# Altium PCB fab_scope_pcb.pcbdoc
Units mil, origin at the board's own origin, x right, y up, seen from the top; angles counter-clockwise.
Board outline 2510 x 3706.06 mil, 2 copper layers (Top Layer, Bottom Layer), stack 62.206 mil thick; 28 components, 35 nets, 134 pads, 0 vias.
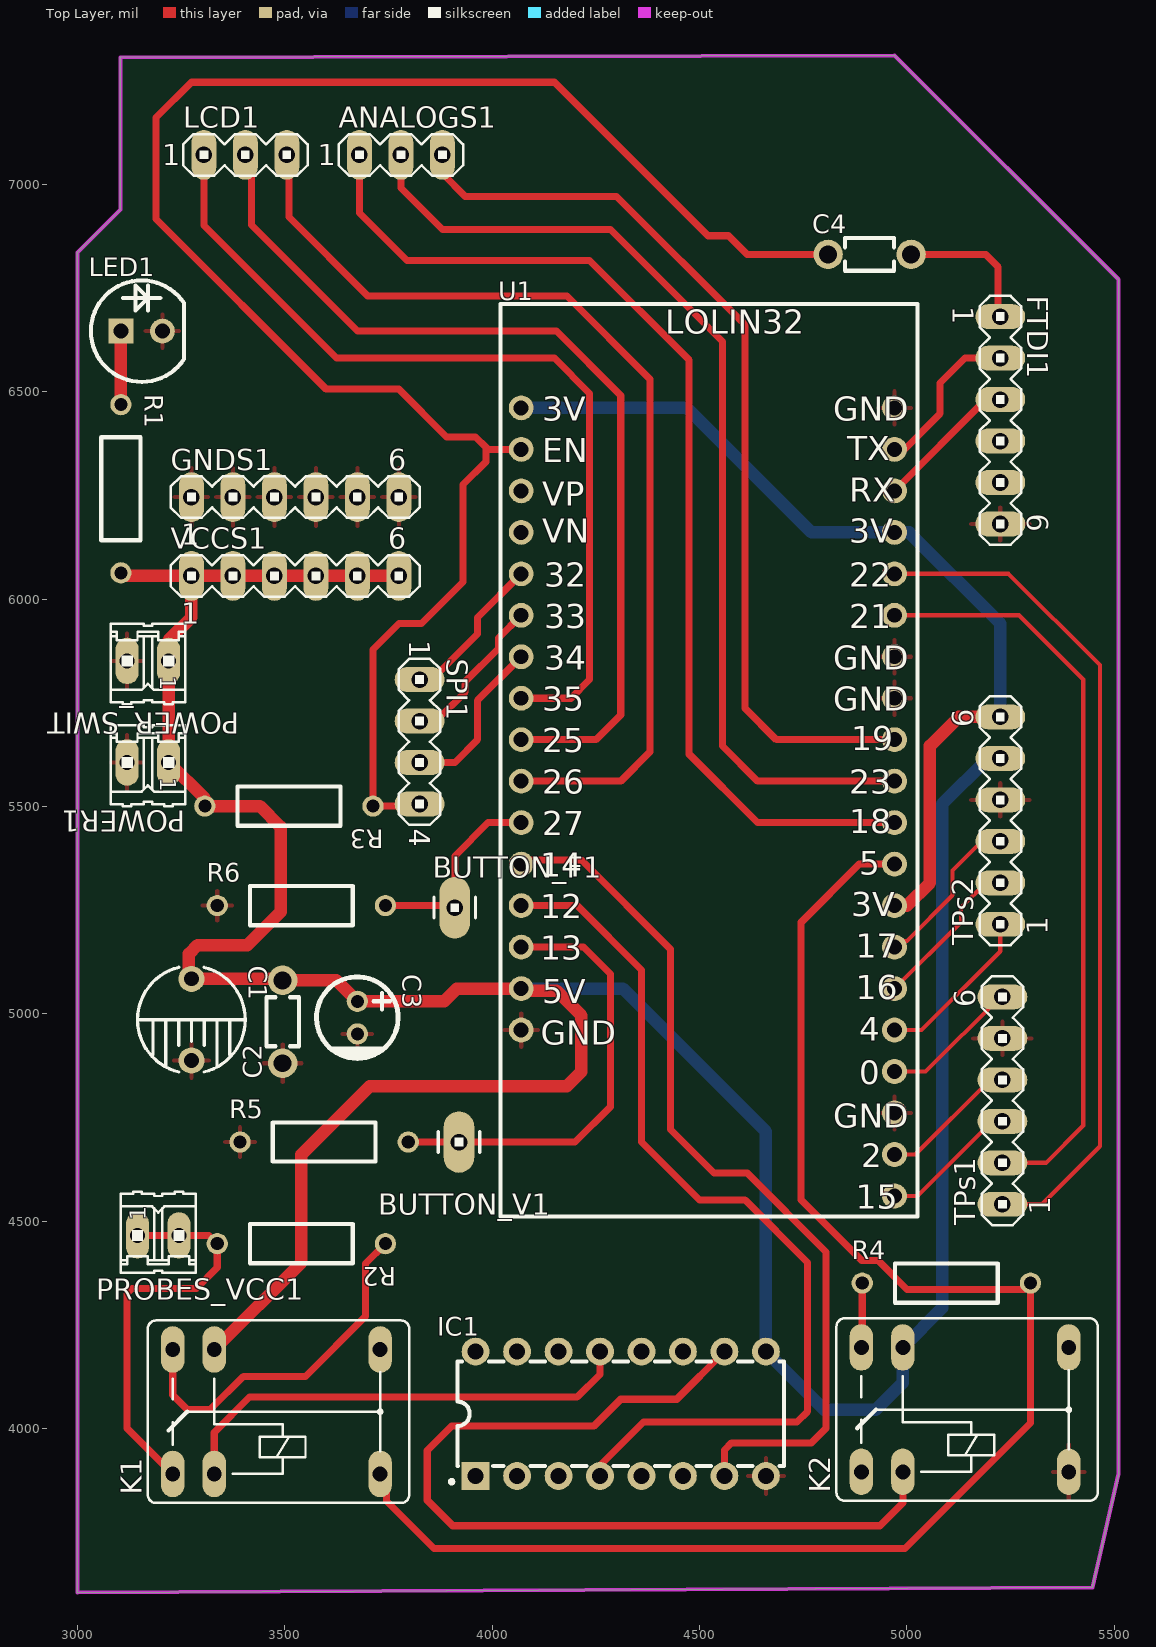
[diagram p0: Top Layer view]
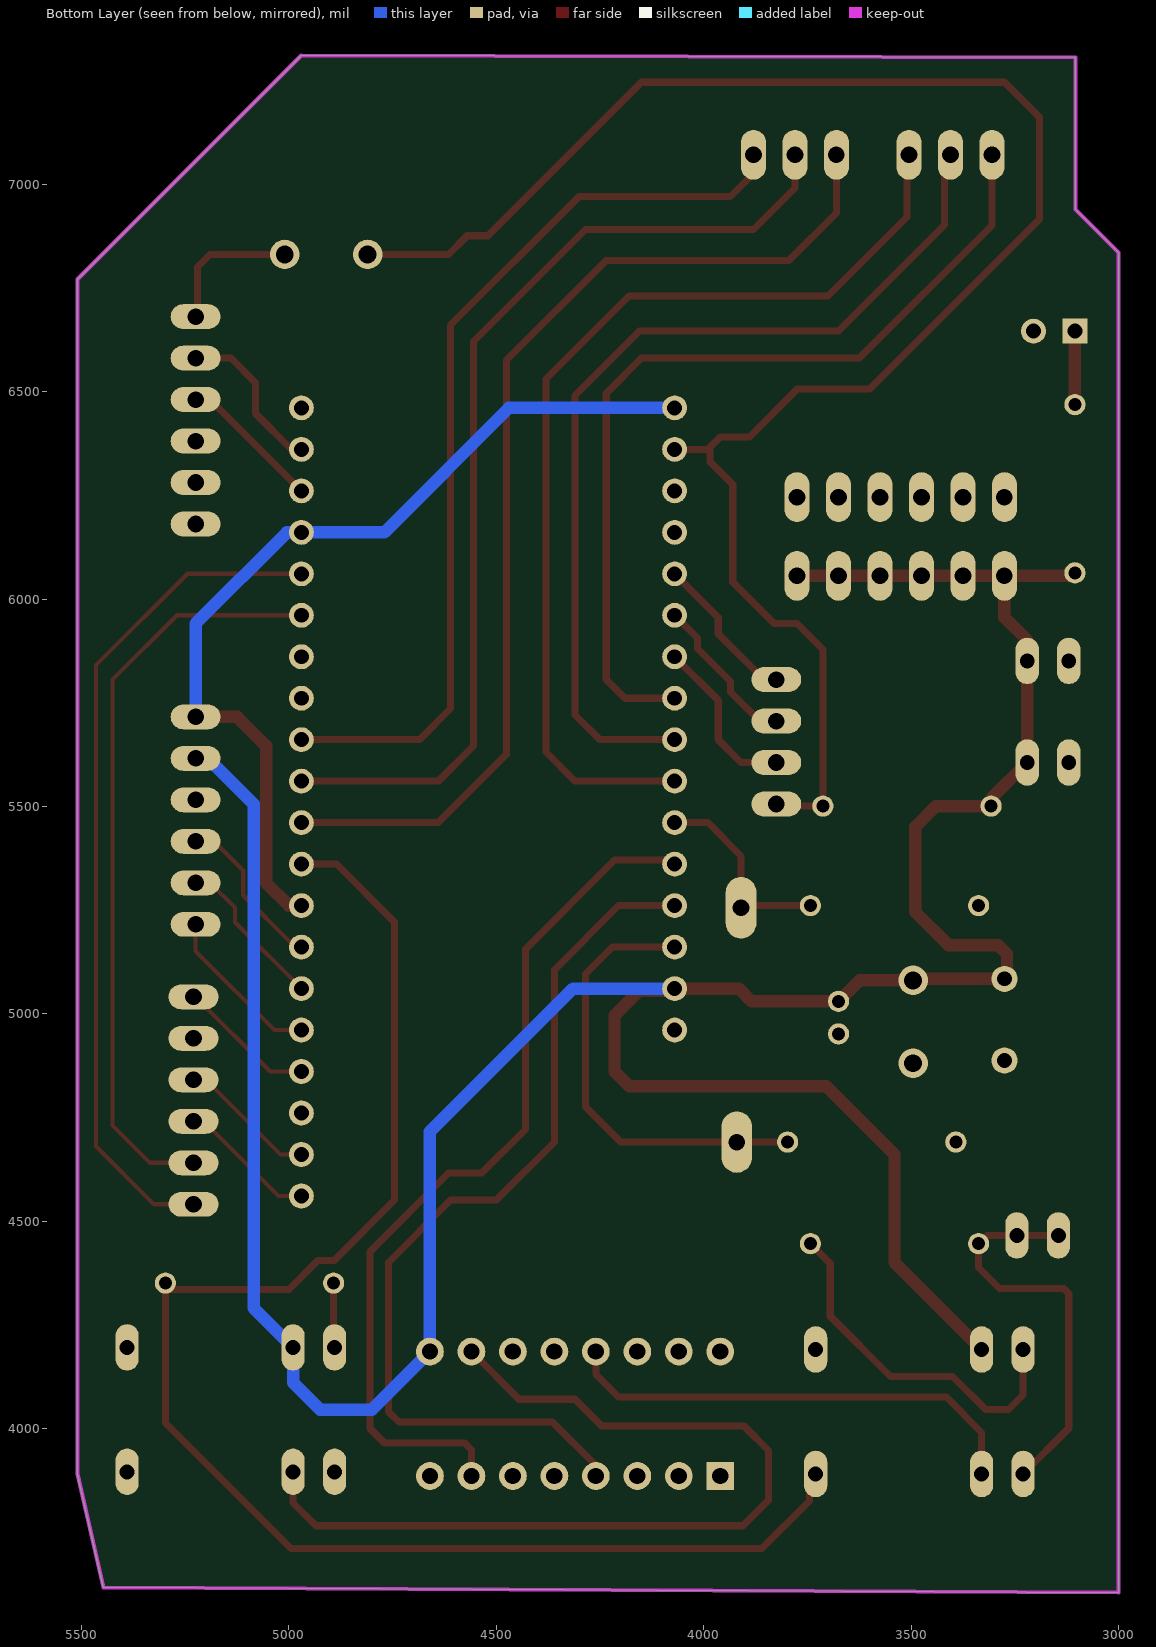
[diagram p1: Bottom Layer view, seen from below]

## Layer stack, top to bottom
Top Solder Mask Layer: solder mask 0.394, Dk 3.3
Top Layer: signal copper 1.379
Dielectric1: surface 59.449, FR4, Dk 4.5
Bottom Layer: signal copper 1.378
Bottom Solder Mask Layer: solder mask 0.394, Dk 3.3

## Board outline
3000,3604.72 3000,6835.42 3103.9,6939.32 3103.9,7305.95 4970.17,7310.78 5510,6770.95 5510,3891.09 5447.15,3617.21

## Design rules (kind name [scope] priority, off if disabled: settings)
BoardOutlineClearance copperThickness1oz [All] p0: genericclearance=10 ignorepadtopadclearanceinfootprint=FALSE except(0: Arc-SplitContinuation Track-SplitContinuation SMDPad-SplitContinuation THPad-SplitContinuation Via-SplitContinuation Fill-SplitContinuation Poly-SplitContinuation Region-SplitContinuation Text-SplitContinuation)
BoardOutlineClearance copperThickness2oz [All] p0: genericclearance=10 ignorepadtopadclearanceinfootprint=FALSE except(0: Arc-SplitContinuation Track-SplitContinuation SMDPad-SplitContinuation THPad-SplitContinuation Via-SplitContinuation Fill-SplitContinuation Poly-SplitContinuation Region-SplitContinuation Text-SplitContinuation)
BoardOutlineClearance otherClearance [All] p0: genericclearance=10 ignorepadtopadclearanceinfootprint=FALSE except(0: Arc-SplitContinuation Track-SplitContinuation SMDPad-SplitContinuation THPad-SplitContinuation Via-SplitContinuation Fill-SplitContinuation Poly-SplitContinuation Region-SplitContinuation Text-SplitContinuation)
Clearance copperThickness1oz [All] p1: gap=7 ignorepadtopadclearanceinfootprint=FALSE
Clearance copperThickness2oz [All] p1: gap=7 ignorepadtopadclearanceinfootprint=FALSE
Clearance otherClearance [All] p1: gap=7 ignorepadtopadclearanceinfootprint=FALSE
DiffPairsRouting differentialPair [All] p1: maxuncoupledlength=10 minlimit=6 maxlimit=Infinity mostfreqgap=6 toplayer_minwidth=5 toplayer_prefwidth=10 toplayer_maxwidth=100 bottomlayer_minwidth=5 bottomlayer_prefwidth=10 bottomlayer_maxwidth=100
PasteMaskExpansion pasteMaskExpansion [All] p1: expansion=0
PlaneConnect innerPlane [All] p1: planeconnectstyle=Relief reliefexpansion=20 reliefentries=4 reliefconductorwidth=10 reliefairgap=10
PolygonConnect copperRegion [All] p1: connectstyle=Relief reliefentries=4 reliefconductorwidth=10 polygonreliefangle="90 Angle" airgapwidth=10
RoutingVias viaSize [All] p1: viastyle="Through Hole" holewidth=12.0078 minholewidth=11.811 maxholewidth=248.0314 width=12.0078 minwidth=11.811 maxwidth=248.0314
SolderMaskExpansion solderMaskExpansion [IsVia] p1: useseparateexpansions=TRUE expansion=-1000 expansionbottom=-1000
SolderMaskExpansion solderMaskExpansion [All] p2: useseparateexpansions=TRUE expansion=2 expansionbottom=2
Width copperThickness1oz [All] p1: maxlimit=100 minlimit=5 preferedwidth=10
Width copperThickness2oz [All] p1: maxlimit=100 minlimit=8 preferedwidth=10

## Components (designator, comment, footprint, x,y, rotation, side; value= is the part's Value field where it differs from the comment)
ANALOGS1 "MA03-1" MA03-1 3780,7070.95 r0 top
BUTTON_F1 "M01PTH_LONGPAD" 1X01_LONGPAD 3910,5255.95 r0 top
BUTTON_V1 "M01PTH_LONGPAD" 1X01_LONGPAD 3920,4690.95 r0 top
C1 "1uF" CAP-TH_BD6.3-P5.00-D0.5-FD 3275,4985.95 r270 top
C2 "100nF" CAP-TH_L3.0-W2.0-P5.08-D0.7 3495,4980.95 r90 top
C3 "10uF" CAP-TH_BD5.0-P2.00-D0.8-FD 3675,4990.95 r270 top
C4 "100nF" CAP-TH_L3.0-W2.0-P5.08-D0.7 4910,6830.95 r0 top
FTDI1 "MA06-1" MA06-1 5225,6430.95 r270 top
GNDS1 "MA06-1" MA06-1 3525,6245.95 r0 top
IC1 "ULN2003AN" DIP-16_L19.7-W6.6-P2.54-LS7.6-BL 4310,4035.95 r0 top
K1 "FRS1B" FRS1B 3330,4040.95 r0 top
K2 "FRS1B" FRS1B 4990,4045.95 r0 top
LCD1 "MA03-1" MA03-1 3405,7070.95 r0 top
LED1 "GREEN LED" LED-TH_BD5.9-P2.54-FD-1 3155,6645.95 r0 top
POWER1 "M02" 02P 3170,5605.95 r180 top
POWER_SWITCH1 "M02" 02P 3170,5850.95 r180 top
PROBES_VCC1 "M02" 02P 3195,4465.95 r0 top
R1 "10k" RES-TH_BD2.4-L6.3-P10.30-D0.6 3105,6265.95 r270 top
R2 "100k" RES-TH_BD2.4-L6.3-P10.30-D0.6 3540,4445.95 r180 top
R3 "10k" RES-TH_BD2.4-L6.3-P10.30-D0.6 3510,5500.95 r180 top
R4 "10k" RES-TH_BD2.4-L6.3-P10.30-D0.6 5095,4350.95 r0 top
R5 "10k" RES-TH_BD2.4-L6.3-P10.30-D0.6 3595,4690.95 r0 top
R6 "10k" RES-TH_BD2.4-L6.3-P10.30-D0.6 3540,5260.95 r0 top
SPI1 "MA04-1" MA04-1 3825,5655.95 r270 top
TPs1 "MA06-1" MA06-1 5230,4790.95 r90 top
TPs2 "MA06-1" MA06-1 5225,5465.95 r90 top
U1 "LOLIN32" LOLIN32 4070,6460.95 r0 top
VCCS1 "MA06-1" MA06-1 3525,6055.95 r0 top

## Footprints (in the part's own frame and the unit in brackets; to place one, negate y for a bottom-side part, rotate by r counter-clockwise, add the part's x,y. Pads: shape width x height; smd on the part's side, far side on the other; paste and mask are expansions set on the pad)
1X01_LONGPAD [mil]
  oval 74x148 hole 40 paste+0 mask+4: 1(0,0)
  silkscreen extent -50,-25 50,25
02P [mil]
  oval 56x112 hole 36 paste+0 mask+4: 1(-50,0) 2(50,0)
  silkscreen extent -90,-90 90,105
CAP-TH_BD5.0-P2.00-D0.8-FD [mm]
  round 1.3 hole 0.8: 1(-1,0) 2(1,0)
  silkscreen extent -2.5,-2.5 2.5,2.5
CAP-TH_BD6.3-P5.00-D0.5-FD [mm]
  round 1.6 hole 0.9 paste+0 mask+0.05: 1(-2.5,0) 2(2.5,0)
  silkscreen extent -3.21,-3.3 3.21,3.3
CAP-TH_L3.0-W2.0-P5.08-D0.7 [mm]
  round 1.8 hole 1.1: 1(-2.54,0) 2(2.54,0)
  silkscreen extent -1.5,-1 1.5,1
DIP-16_L19.7-W6.6-P2.54-LS7.6-BL [mm]
  rect 1.7x1.7 hole 1: 1(-8.89,-3.81)
  round 1.7 hole 1: 2(-6.35,-3.81) 3(-3.81,-3.81) 4(-1.27,-3.81) 5(1.27,-3.81) 6(3.81,-3.81) 7(6.35,-3.81) 8(8.89,-3.81) 9(8.89,3.81) 10(6.35,3.81) 11(3.81,3.81) 12(1.27,3.81) 13(-1.27,3.81) 14(-3.81,3.81) 15(-6.35,3.81) 16(-8.89,3.81)
  silkscreen extent -10.46,-4.26 10,3.2
FRS1B [mil]
  oval 56x112 hole 36 paste+0 mask+4: 1(0,150) 2(0,-150) O(-100,-150) P(400,-150) P(400,150) S(-100,150)
  silkscreen extent -160,-220 470,220
LED-TH_BD5.9-P2.54-FD-1 [mil]
  rect 60x60 hole 36: 1(-50,0)
  round 60 hole 36: 2(50,0)
  silkscreen extent -122,-122 102,122
LOLIN32 [mil]
  round 60 hole 36 paste+0 mask+4: 1(0,0) 2(0,-100) 3(0,-200) 4(0,-300) 5(0,-400) 6(0,-500) 7(0,-600) 8(0,-700) 9(0,-800) 10(0,-900) 11(0,-1000) 12(0,-1100) 13(0,-1200) 14(0,-1300) 15(0,-1400) 16(0,-1500) 17(900,0) 18(900,-100) 19(900,-200) 20(900,-300) 21(900,-400) 22(900,-500) 23(900,-600) 24(900,-700) 25(900,-800) 26(900,-900) 27(900,-1000) 28(900,-1100) 29(900,-1200) 30(900,-1300) 31(900,-1400) 32(900,-1500) 33(900,-1600) 34(900,-1700) 35(900,-1800) 36(900,-1900)
  silkscreen extent -50,-1949 955,250
MA03-1 [mil]
  oval 60x120 hole 40 paste+0 mask+4: 1(-100,0) 2(0,0) 3(100,0)
  silkscreen extent -150,-50 150,50
MA04-1 [mil]
  oval 60x120 hole 40 paste+0 mask+4: 1(-150,0) 2(-50,0) 3(50,0) 4(150,0)
  silkscreen extent -200,-50 200,50
MA06-1 [mil]
  oval 60x120 hole 40 paste+0 mask+4: 1(-250,0) 2(-150,0) 3(-50,0) 4(50,0) 5(150,0) 6(250,0)
  silkscreen extent -300,-50 300,50
RES-TH_BD2.4-L6.3-P10.30-D0.6 [mm]
  round 1.3 hole 0.8: 1(-5.15,0) 2(5.15,0)
  silkscreen extent -3.15,-1.2 3.15,1.2

## Nets (pads, with @x,y where several pads share a name; then routed paths per layer and width w, separated by ;. In a path a pad name is that pad's centre, name@x,y a point inside that pad or via, vN(x,y) a via of type N, cw(c..) or ccw(c..) an arc to the next point about the centre after c; other vN are vias at no path point)
3v3: TPs2.6 U1.1 U1.20 U1.29 | length 2232.2
  Top Layer w30: U1.29 5000,5260.95 5055,5315.95 5055,5645.95 5125,5715.95 TPs2.6
  Bottom Layer w30: U1.1 4470,6460.95 4770,6160.95 U1.20 5005,6160.95 5225,5940.95 TPs2.6
BUTTON_F: BUTTON_F1.1 R6.2 U1.11 | length 487.4
  Top Layer w17: R6.2 3905,5260.95 BUTTON_F1.1 3910,5380.95 3990,5460.95 U1.11
BUTTON_V: BUTTON_V1.1 R5.2 U1.14 | length 1084.4
  Top Layer w17: R5.2 BUTTON_V1.1 4200,4690.95 4285,4775.95 4285,5095.95 4220,5160.95 U1.14
EN: C4.1 R3.1 SPI1.4 U1.2 | length 4306.3
  Top Layer w17: SPI1.4 3820,5500.95 R3.1 3712.76,5878.71 3775,5940.95 3830,5940.95 3930,6040.95 3930,6275.95 3985,6330.95 3985,6365.95 ; U1.2 3990,6360.95 3985,6365.95 ; C4.1 4615,6830.95 4570,6875.95 4520,6875.95 4150,7245.95 3275,7245.95 3190,7160.95 3190,6915.95 3600,6505.95 3775,6505.95 3890,6390.95 3960,6390.95 3985,6365.95
FTDI_RESET: C4.2 FTDI1.1 | length 344.5
  Top Layer w17: C4.2 5190,6830.95 5220,6800.95 5220,6685.95 FTDI1.1
GND: C1.2 C2.1 C3.2 FTDI1.6 GNDS1.1 GNDS1.2 GNDS1.3 GNDS1.4 GNDS1.5 GNDS1.6 IC1.8 K2.P@5390,3895.95 LED1.2 POWER1.2 POWER_SWITCH1.2 R5.1 R6.1 TPs1.5 TPs2.4 U1.16 U1.17 U1.23 U1.24 U1.34
LCD_1: LCD1.1 U1.8 | length 2141.4
  Top Layer w17: LCD1.1 3305,6900.95 3625,6580.95 4150,6580.95 4235,6495.95 4235,5805.95 4190,5760.95 U1.8
LCD_2: LCD1.2 U1.9 | length 2270.9
  Top Layer w17: LCD1.2 3419.52,7056.43 3419.52,6901.43 3675,6645.95 4155,6645.95 4310,6490.95 4310,5720.95 4250,5660.95 U1.9
LCD_3: LCD1.3 U1.10 | length 2422.6
  Top Layer w17: LCD1.3 3510,7065.95 3510,6920.95 3700,6730.95 4180,6730.95 4380,6530.95 4380,5630.95 4310,5560.95 U1.10
N$4: IC1.10 K2.2 | length 2204.9
  Top Layer w17: IC1.10@4560,4185.95 4445,4070.95 4310,4070.95 4245,4005.95 3902.14,4005.95 3843.57,3947.38 3843.57,3827.38 3905,3765.95 4935,3765.95 4990,3820.95 K2.2
N$5: IC1.13 K1.2 | length 1143
  Top Layer w17: K1.2 3330,3990.95 3415,4075.95 4205,4075.95 4260,4130.95 IC1.13@4260,4185.95
N$11: K2.S R4.1 | length 155.9
  Top Layer w17: K2.S 4892.24,4198.19 R4.1
N$14: K1.S R2.1 | length 877.5
  Top Layer w17: K1.S 3230,4080.95 3265,4045.95 3320,4045.95 3400,4125.95 3550,4125.95 3695,4270.95 3695,4398.19 R2.1
N$26: LED1.1 R1.1 | length 177.2
  Top Layer w30: R1.1 LED1.1
PIN0: TPs1.6 U1.33 | length 334.6
  Top Layer w10: U1.33 5045,4860.95 5225,5040.95 TPs1.6
PIN2: TPs1.4 U1.35 | length 334.6
  Top Layer w10: U1.35 5020,4660.95 5200,4840.95 TPs1.4
PIN4: TPs2.1 U1.32 | length 398.7
  Top Layer w10: U1.32 5035,4960.95 5225,5150.95 TPs2.1
PIN15: TPs1.3 U1.36 | length 334.6
  Top Layer w10: U1.36 5025,4560.95 5205,4740.95 TPs1.3
PIN16: TPs2.2 U1.31 | length 381.1
  Top Layer w10: U1.31 5130,5220.95 5130,5255.95 5190,5315.95 TPs2.2
PIN17: TPs2.3 U1.30 | length 395.8
  Top Layer w10: U1.30 4985,5175.95 5000,5175.95 5110,5285.95 5110,5345.95 5180,5415.95 TPs2.3
PIN21: TPs1.2 U1.22 | length 1826.5
  Top Layer w10: U1.22 5270,5960.95 5425,5805.95 5425,4730.95 5335,4640.95 TPs1.2
PIN22: TPs1.1 U1.21 | length 2039.1
  Top Layer w10: U1.21 5245,6060.95 5465,5840.95 5465,4680.95 5325,4540.95 TPs1.1
POT_F: ANALOGS1.3 U1.25 | length 2242.3
  Top Layer w17: ANALOGS1.3 3880,7025.95 3935,6970.95 4300,6970.95 4610,6660.95 4610,5735.95 4685,5660.95 U1.25
POT_LCD: ANALOGS1.2 U1.26 | length 2433.5
  Top Layer w17: ANALOGS1.2 3780,6990.95 3880,6890.95 4285,6890.95 4555,6620.95 4555,5645.95 4640,5560.95 U1.26
PROBE: K1.P@3730,3890.95 R4.2 U1.28 | length 3735.3
  Top Layer w17: K1.P@3730,3890.95 3745,3875.95 3745,3825.95 3860,3710.95 4995,3710.95 5297.76,4013.71 R4.2 5282.76,4335.95 5000,4335.95 4930,4405.95 4890,4405.95 4745,4550.95 4745,5220.95 4885,5360.95 U1.28
RELAY_1: IC1.4 U1.13 | length 2228.2
  Top Layer w17: U1.13 4205,5260.95 4360,5105.95 4360,4690.95 4500,4550.95 4610,4550.95 4760,4400.95 4760,4040.95 4735,4015.95 4365,4015.95 4260,3910.95 IC1.4
RELAY_2: IC1.7 U1.12 | length 2139.9
  Top Layer w17: U1.12 4080,5370.95 4215,5370.95 4430,5155.95 4430,4720.95 4535,4615.95 4615,4615.95 4805,4425.95 4805,4000.95 4770,3965.95 4577,3965.95 4560,3948.95 IC1.7
RX: FTDI1.3 U1.19 | length 346.1
  Top Layer w17: U1.19 5190,6480.95 FTDI1.3
SPI1: SPI1.1 U1.5 | length 374.1
  Top Layer w17: SPI1.1 3855,5805.95 3965,5915.95 3965,5955.95 U1.5
SPI2: SPI1.2 U1.6 | length 379.9
  Top Layer w17: SPI1.2 3865,5705.95 3935,5775.95 3935,5800.95 4015,5880.95 4015,5905.95 U1.6
SPI3: SPI1.3 U1.7 | length 406.3
  Top Layer w17: SPI1.3 3910,5605.95 3965,5660.95 3965,5755.95 U1.7
TX: FTDI1.2 U1.18 | length 389.5
  Top Layer w17: U1.18 4994.04,6360.95 5080,6446.91 5080,6520.95 5140,6580.95 FTDI1.2
V_MEASURE: ANALOGS1.1 U1.27 | length 2595.4
  Top Layer w17: ANALOGS1.1 3680,6930.95 3795,6815.95 4235,6815.95 4475,6575.95 4475,5625.95 4640,5460.95 U1.27
V_PROBES: K1.O PROBES_VCC1.1 PROBES_VCC1.2 R2.2 | length 981.9
  Top Layer w17: PROBES_VCC1.1 PROBES_VCC1.2 3317.24,4465.95 R2.2 3337.24,4388.19 3287.02,4337.97 3132.02,4337.97 3120,4325.95 3120,4000.95 K1.O
VCC: C1.1 C2.2 C3.1 IC1.9 K1.1 K2.1 POWER1.1 POWER_SWITCH1.1 R1.2 R3.2 TPs2.5 U1.15 VCCS1.1 VCCS1.2 VCCS1.3 VCCS1.4 VCCS1.5 VCCS1.6 | length 7771
  Top Layer w30: R1.2 3112.24,6055.95 VCCS1.1 ; K1.1 3540,4400.95 3540,4660.95 3705,4825.95 4180,4825.95 4215,4860.95 4215,4995.95 4155,5055.95 4075,5055.95 U1.15 3915,5060.95 3884.37,5030.32 C3.1 3624.37,5080.95 C2.2 3491.57,5084.37 C1.1 3268.79,5090.59 3268.79,5144.73 3290,5165.95 3410,5165.95 3490,5245.95 3490,5450.95 3440,5500.95 R3.2 3307.24,5518.71 POWER1.1 POWER_SWITCH1.1 3220,5900.95 3275,5955.95 VCCS1.1 ; VCCS1.6 VCCS1.5 VCCS1.4 VCCS1.3 VCCS1.2 VCCS1.1
  Bottom Layer w30: U1.15 4315,5060.95 4660,4715.95 4660,4185.95 4800,4045.95 4925,4045.95 4990,4110.95 K2.1 5085,4290.95 5085,5505.95 5195,5615.95 TPs2.5
pads on no net: FTDI1.4 FTDI1.5 IC1.1 IC1.2 IC1.3 IC1.5 IC1.6 IC1.11 IC1.12 IC1.14 IC1.15 IC1.16 K1.P@3730,4190.95 K2.O K2.P@5390,4195.95 U1.3 U1.4

## Polygon pours and split planes (outlines as drawn)
GND on Top Layer (solid, remove dead copper, pour order 0): 3105,7305.95 4970,7305.95 4975,7310.95 5510,6775.95 5515,6775.95 5515,3896.09 5510,3891.09 5510,3690.91 5436.24,3617.15 3012.43,3617.15 3000,3604.72 3000,6835.42 3108.97,6944.39 3108.97,7301.98

## Keep-outs
Board Outline Layer:
  the board outline again, w10

## Dimensions
6265.83,7163.03 to 6323.32,3027.08 on Document Layer

## Text inside footprints (layer, text, board x,y; h text height)
ANALOGS1: Top Silkscreen Layer "1" at 3580,7045.95 h50
FTDI1: Top Silkscreen Layer "1" at 5110,6705.95 h50 r270; Top Silkscreen Layer "6" at 5290,6205.95 h50 r270
GNDS1: Top Silkscreen Layer "1" at 3250,6130.95 h50; Top Silkscreen Layer "6" at 3750,6310.95 h50
LCD1: Top Silkscreen Layer "1" at 3205,7045.95 h50
POWER1: Top Silkscreen Layer "1" at 3200,5568.95 h39 r270
POWER_SWITCH1: Top Silkscreen Layer "1" at 3200,5813.95 h39 r270
PROBES_VCC1: Top Silkscreen Layer "1" at 3165,4502.95 h39 r90
SPI1: Top Silkscreen Layer "1" at 3800,5900.95 h50 r270; Top Silkscreen Layer "4" at 3800,5445.95 h50 r270
TPs1: Top Silkscreen Layer "1" at 5345,4515.95 h50 r90; Top Silkscreen Layer "6" at 5165,5015.95 h50 r90
TPs2: Top Silkscreen Layer "1" at 5340,5190.95 h50 r90; Top Silkscreen Layer "6" at 5160,5690.95 h50 r90
U1: Top Silkscreen Layer "3V" at 4121.01,6430.19 h58.05; Top Silkscreen Layer "GND" at 4117.21,4925.19 h58.05; Top Silkscreen Layer "GND" at 4822.21,6430.19 h58.05; Top Silkscreen Layer "2" at 4890,4630.67 h57.17; Top Silkscreen Layer "EN" at 4121.01,6330.19 h58.05; Top Silkscreen Layer "VP" at 4121.01,6225.19 h58.05; Top Silkscreen Layer "VN" at 4121.01,6135.19 h58.05; Top Silkscreen Layer "32" at 4126.01,6030.19 h58.05; Top Silkscreen Layer "33" at 4126.01,5930.19 h58.05; Top Silkscreen Layer "34" at 4126.01,5830.19 h58.05; Top Silkscreen Layer "35" at 4121.01,5730.19 h58.05; Top Silkscreen Layer "25" at 4121.01,5630.19 h58.05; Top Silkscreen Layer "26" at 4121.01,5530.19 h58.05; Top Silkscreen Layer "27" at 4121.01,5430.19 h58.05; Top Silkscreen Layer "14" at 4116.01,5330.19 h58.05; Top Silkscreen Layer "12" at 4116.01,5230.19 h58.05; Top Silkscreen Layer "13" at 4116.01,5130.19 h58.05; Top Silkscreen Layer "5V" at 4121.01,5025.19 h58.05; Top Silkscreen Layer "TX" at 4856.01,6335.19 h58.05; Top Silkscreen Layer "RX" at 4861.01,6235.19 h58.05; Top Silkscreen Layer "3V" at 4861.01,6135.19 h58.05; Top Silkscreen Layer "22" at 4861.01,6030.19 h58.05; Top Silkscreen Layer "21" at 4861.01,5930.19 h58.05; Top Silkscreen Layer "GND" at 4822.21,5830.19 h58.05; Top Silkscreen Layer "GND" at 4822.21,5730.19 h58.05; Top Silkscreen Layer "19" at 4866.01,5635.19 h58.05; Top Silkscreen Layer "23" at 4861.01,5530.19 h58.05; Top Silkscreen Layer "18" at 4861.01,5435.19 h58.05; Top Silkscreen Layer "5" at 4885,5335.67 h57.17; Top Silkscreen Layer "3V" at 4866.01,5235.19 h58.05; Top Silkscreen Layer "17" at 4876.01,5135.19 h58.05; Top Silkscreen Layer "16" at 4876.01,5035.19 h58.05; Top Silkscreen Layer "15" at 4876.01,4530.19 h58.05; Top Silkscreen Layer "4" at 4885,4935.67 h57.17; Top Silkscreen Layer "0" at 4885,4830.67 h57.17; Top Silkscreen Layer "GND" at 4822.21,4725.19 h58.05
VCCS1: Top Silkscreen Layer "1" at 3250,5940.95 h50; Top Silkscreen Layer "6" at 3750,6120.95 h50